# Altium PCB PCB.PcbDoc (part 2 of 2)
Units mil, origin at the board's own origin, x right, y up, seen from the top; angles counter-clockwise.
Board outline 1965.12 x 2985.07 mil, 4 copper layers (Top Layer, digital, gnd, Bottom Layer), stack 23.756 mil thick; 141 components, 79 nets, 449 pads, 482 vias.
Unrouted connection lines stored in the file: 63.
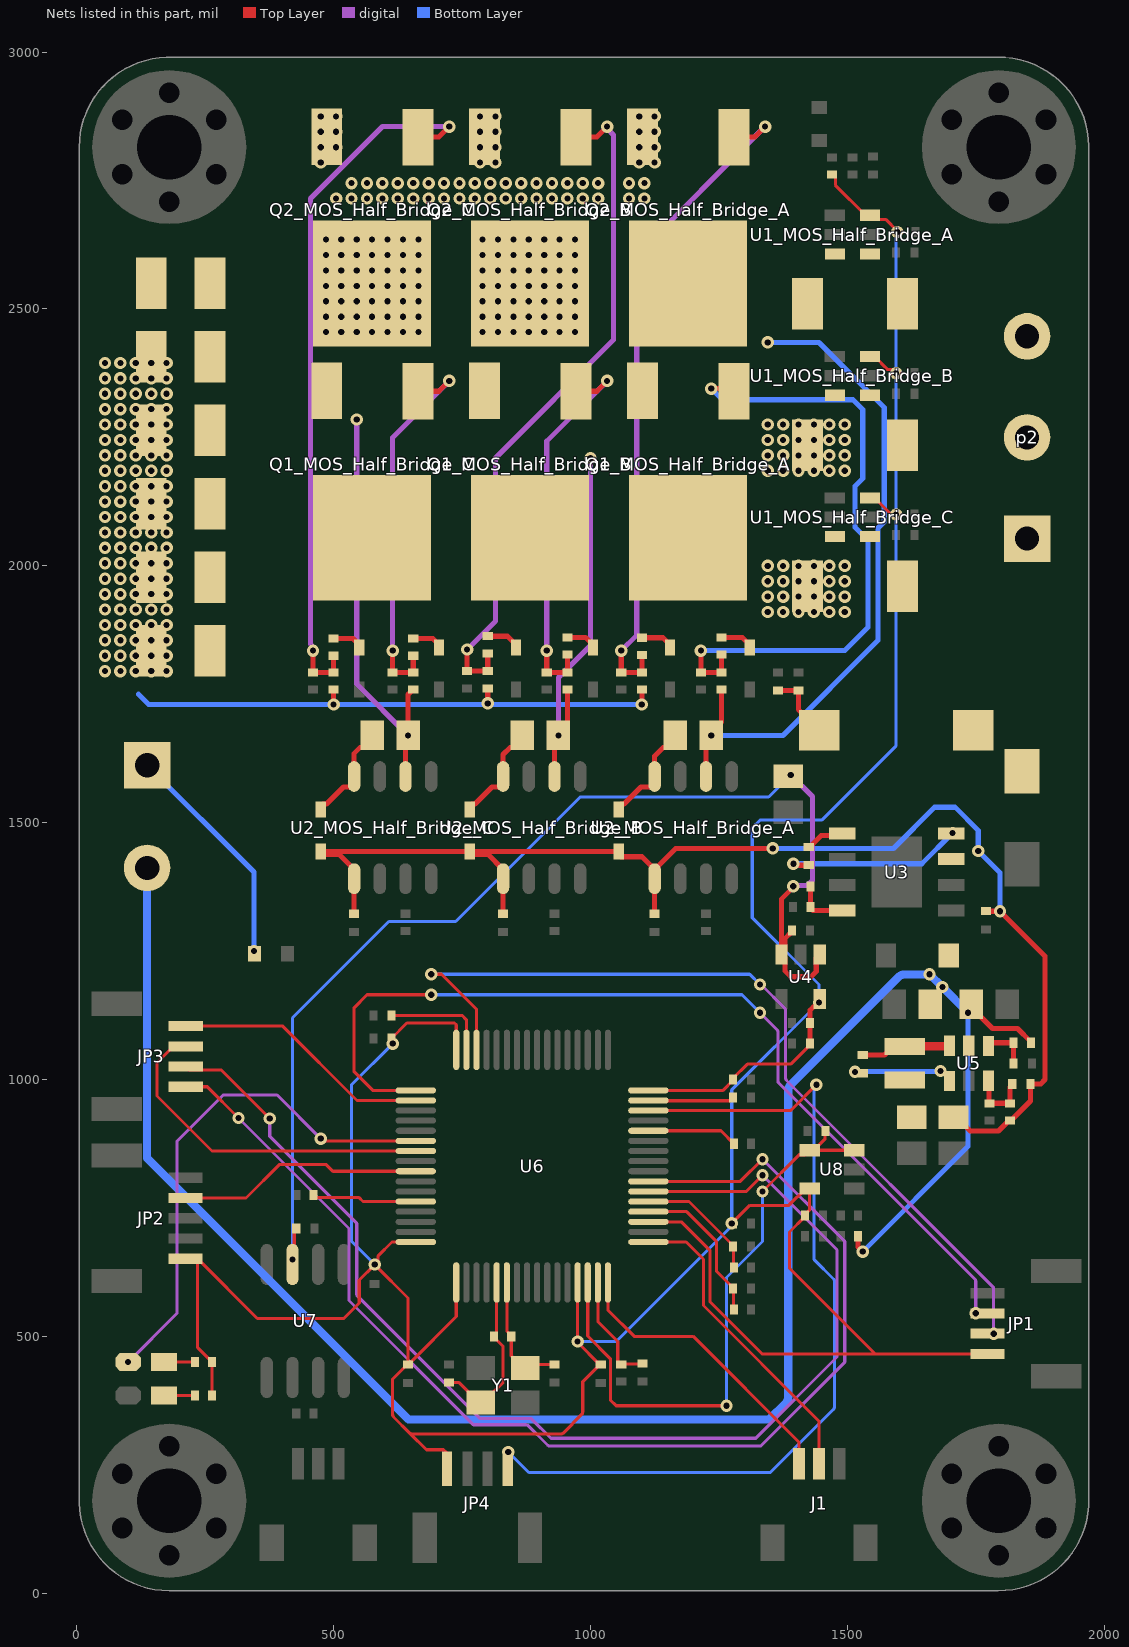
[diagram p4: the nets of this part, all layers, seen from the top]

## Via types
v1: diameter 24, hole 12, Top Layer to Bottom Layer, tented both sides, 482 vias

## Nets (pads, with @x,y where several pads share a name; then routed paths per layer and width w, separated by ;. In a path a pad name is that pad's centre, name@x,y a point inside that pad or via, vN(x,y) a via of type N, cw(c..) or ccw(c..) an arc to the next point about the centre after c; other vN are vias at no path point) (continued)
INC_SDA: JP4.4 U6.30 | length 1730.9
  Top Layer w6: JP4.4@839.05,242.12 839.05,274.05 v1(840,275) ; U6.30@1112.79,939.64 1387.15,939.64 ccw(c1387.15,945.64) 1391.38,941.38 v1(1439.85,989.85)
  Bottom Layer w6: v1(840,275) 880,235 1350,235 1473.24,358.24 ccw(c1469,362.49) 1475,362.49 1475,607.51 ccw(c1469,607.51) 1473.26,611.74 1436.75,648.25 cw(c1441,652.49) 1435,652.49 1435,977.94 cw(c1441,977.94) 1435.54,980.43 v1(1439.85,989.85)
ISA: C36.2 R24.1 U6.15 | length 221.5
  Top Layer w6: U6.15@1014.37,605 1014.37,528.93 1053.15,490.14 1053.15,450.22 1058.03,445.34 R24.1@1060,445.34 1060.98,446.32 1100.02,446.32 C36.2@1101,447.31
ISB: C38.2 R27.1 U6.20 | length 303.4
  Top Layer w6: U6.20@1112.79,742.79 1187.21,742.79 1245,685 1245,627.35 1277.38,594.97 C38.2@1277.38,593 1278.37,592.02 1278.37,552.98 R27.1@1279.35,552
ISC: C39.2 R28.1 U6.21 | length 243.8
  Top Layer w6: U6.21@1112.79,762.47 1191.89,762.47 1277.38,676.97 C39.2@1277.38,675 1278.37,674.02 1278.37,634.98 R28.1@1279.35,634
LED: LED2.2 U6.54 | length 1008.7
  Top Layer w6: v1(475,885) 479.42,880.58 U6.54@660.05,880.58
  digital w6: v1(100,450) 195,545 195,880 285,970 390,970 v1(475,885)
NetC5_MOS_Half_Bridge_A_1: C5_MOS_Half_Bridge_A.1 D3_MOS_Half_Bridge_A.2 U2_MOS_Half_Bridge_A.8 | length 208.2
  Top Layer w10: D3_MOS_Half_Bridge_A.2@1055,1525.94 1055,1531.45 1059.84,1536.29 1065.35,1536.29 1098.38,1569.32 1118.53,1569.32 1125,1575.79 U2_MOS_Half_Bridge_A.8@1125,1590 1125,1630.04 1141.02,1646.06 1147.13,1646.06 1164.96,1663.9 C5_MOS_Half_Bridge_A.1@1164.96,1670
NetC5_MOS_Half_Bridge_B_1: C5_MOS_Half_Bridge_B.1 D3_MOS_Half_Bridge_B.2 U2_MOS_Half_Bridge_B.8 | length 202.2
  Top Layer w10: D3_MOS_Half_Bridge_B.2@765,1525.94 765,1531.45 769.84,1536.29 775.35,1536.29 808.38,1569.32 823.53,1569.32 830,1575.79 U2_MOS_Half_Bridge_B.8@830,1590 830,1632.52 843.54,1646.06 849.65,1646.06 867.48,1663.9 C5_MOS_Half_Bridge_B.1@867.48,1670
NetC5_MOS_Half_Bridge_C_1: C5_MOS_Half_Bridge_C.1 D3_MOS_Half_Bridge_C.2 U2_MOS_Half_Bridge_C.8 | length 201.2
  Top Layer w10: D3_MOS_Half_Bridge_C.2@475,1525.94 475,1531.45 479.84,1536.29 486.29,1536.29 519.32,1569.32 533.53,1569.32 540,1575.79 U2_MOS_Half_Bridge_C.8@540,1590 540,1635 551.06,1646.06 557.17,1646.06 575,1663.9 C5_MOS_Half_Bridge_C.1@575,1670
NetC7_1: C7.1 D4.2 L1.1 U3.8 | length 366
  Top Layer w10: v1(1395,1420) 1397.72,1417.28 C7.1@1425,1417.28
  Bottom Layer w10: v1(1395,1420) 1645,1420 v1(1705,1480)
NetC7_2: C7.2 U3.1 | length 75.8
  Top Layer w10: C7.2@1425,1452.71 1426.97,1452.71 1449.26,1475 1485.94,1475 U3.1@1489.95,1479.01
NetC15_1: C15.1 L2.1 U5.6 | length 176.6
  Top Layer w10: C15.1@1530,1047.72 1572.55,1047.72 1588.88,1064.04 L2.1@1611.52,1064.04
  Top Layer w16: L2.1@1611.52,1064.04 1612.44,1064.97 1698.19,1064.97 U5.6@1699.12,1065.89
NetC15_2: C15.2 U5.1 | length 198
  Top Layer w10: v1(1681.52,1016.56) 1685.31,1016.56 1689.94,1011.93 1693.29,1011.93 1699.12,1006.1 U5.1@1699.12,997.24
  Bottom Layer w10: v1(1515,1015) 1515.78,1015.78 1680.73,1015.78 v1(1681.52,1016.56)
NetC16_1: C16.1 R15.1 R16.2 U5.3 | length 124.3
  Top Layer w10: U5.3@1774.52,997.56 1775.56,996.52 1775.56,954.79 R16.2@1776.6,953.75 R15.1@1816.52,953.75 1816.52,985.03 1821.09,989.6 C16.1@1821.09,991.57
NetC19_2: C19.2 R14.2 U5.4 | length 91.9
  Top Layer w10: U5.4@1774.52,1065.56 1774.52,1065.74 1780.34,1071.57 R14.2@1823.8,1071.57 C19.2@1823.8,1031.57
NetC28_2: C28.2 U6.31 | length 168.3
  Top Layer w6: U6.31@1112.79,959.32 1113.45,958.66 1272.41,958.66 1277.29,963.53 C28.2@1277.29,965
NetC29_2: C29.2 U6.47 | length 208.1
  Top Layer w6: C29.2@612.71,1125 750,1125 758.47,1116.53 U6.47@758.47,1057.74
NetD1_MOS_Half_Bridge_A_1: D1_MOS_Half_Bridge_A.1 R1_MOS_Half_Bridge_A.1 | length 66.4
  Top Layer w10: R1_MOS_Half_Bridge_A.1@1255,1860.75 1295.7,1860.75 1310,1846.45 D1_MOS_Half_Bridge_A.1@1310,1840.94
NetD1_MOS_Half_Bridge_B_1: D1_MOS_Half_Bridge_B.1 R1_MOS_Half_Bridge_B.1 | length 61.4
  Top Layer w10: R1_MOS_Half_Bridge_B.1@955,1860.75 990.7,1860.75 1005,1846.45 D1_MOS_Half_Bridge_B.1@1005,1840.94
NetD1_MOS_Half_Bridge_C_1: D1_MOS_Half_Bridge_C.1 R1_MOS_Half_Bridge_C.1 | length 60.5
  Top Layer w10: R1_MOS_Half_Bridge_C.1@655,1858.46 692.99,1858.46 705,1846.45 D1_MOS_Half_Bridge_C.1@705,1840.94
NetD2_MOS_Half_Bridge_A_1: D2_MOS_Half_Bridge_A.1 R5_MOS_Half_Bridge_A.1 | length 66.1
  Top Layer w10: R5_MOS_Half_Bridge_A.1@1100,1860 1141.45,1860 1155,1846.45 D2_MOS_Half_Bridge_A.1@1155,1840.94
NetD2_MOS_Half_Bridge_B_1: D2_MOS_Half_Bridge_B.1 R5_MOS_Half_Bridge_B.1 | length 67.4
  Top Layer w10: R5_MOS_Half_Bridge_B.1@799.99,1863.04 838.41,1863.04 855,1846.45 D2_MOS_Half_Bridge_B.1@855,1840.94
NetD2_MOS_Half_Bridge_C_1: D2_MOS_Half_Bridge_C.1 R5_MOS_Half_Bridge_C.1 | length 60.5
  Top Layer w10: R5_MOS_Half_Bridge_C.1@500,1858.46 537.99,1858.46 550,1846.45 D2_MOS_Half_Bridge_C.1@550,1840.94
NetLED1_1: LED1.1 R12.2 | length 60.1
  Top Layer w6: LED1.1@170,384.74 229.74,384.74 R12.2@230,385
NetLED2_1: LED2.1 R18.2 | length 60
  Top Layer w6: LED2.1@170,450 R18.2@230,450
NetQ1_MOS_Half_Bridge_A_1: Q1_MOS_Half_Bridge_A.1 R1_MOS_Half_Bridge_A.2 R2_MOS_Half_Bridge_A.2 R3_MOS_Half_Bridge_A.2 | length 1259.8
  Top Layer w10: v1(1215,1835) R2_MOS_Half_Bridge_A.2@1215,1792.71 R3_MOS_Half_Bridge_A.2@1255,1792.71 R1_MOS_Half_Bridge_A.2@1255,1827.29 ; v1(1235,2345) 1274.32,2345 Q1_MOS_Half_Bridge_A.1@1279.55,2339.77
  Bottom Layer w10: v1(1215,1835) 1495,1835 1540,1880 1540,2050 1515,2075 1515,2155 1530,2170 1530,2304.14 1510.91,2323.23 1256.77,2323.23 v1(1235,2345)
NetQ1_MOS_Half_Bridge_B_1: Q1_MOS_Half_Bridge_B.1 R1_MOS_Half_Bridge_B.2 R2_MOS_Half_Bridge_B.2 R3_MOS_Half_Bridge_B.2 | length 759.4
  Top Layer w10: v1(915,1835) R2_MOS_Half_Bridge_B.2@915,1792.71 R3_MOS_Half_Bridge_B.2@955,1792.71 R1_MOS_Half_Bridge_B.2@955,1827.29 ; Q1_MOS_Half_Bridge_B.1@972.05,2339.77 1012.27,2339.77 v1(1032.5,2360)
  digital w10: v1(915,1835) 915,2242.5 v1(1032.5,2360)
NetQ1_MOS_Half_Bridge_C_1: Q1_MOS_Half_Bridge_C.1 R1_MOS_Half_Bridge_C.2 R2_MOS_Half_Bridge_C.2 R3_MOS_Half_Bridge_C.2 | length 754
  Top Layer w10: v1(615,1835) R2_MOS_Half_Bridge_C.2@615,1792.71 R3_MOS_Half_Bridge_C.2@655,1792.71 R1_MOS_Half_Bridge_C.2@655,1825 ; Q1_MOS_Half_Bridge_C.1@664.55,2339.77 704.77,2339.77 v1(725,2360)
  digital w10: v1(615,1835) 615,2250 v1(725,2360)
NetQ2_MOS_Half_Bridge_A_1: Q2_MOS_Half_Bridge_A.1 R5_MOS_Half_Bridge_A.2 R6_MOS_Half_Bridge_A.2 R7_MOS_Half_Bridge_A.2 | length 1320.9
  Top Layer w10: v1(1060,1835) R6_MOS_Half_Bridge_A.2@1060,1792.71 R7_MOS_Half_Bridge_A.2@1100,1792.71 R5_MOS_Half_Bridge_A.2@1100,1826.54 ; Q2_MOS_Half_Bridge_A.1@1279.55,2834.77 1319.77,2834.77 v1(1340,2855)
  digital w10: v1(1060,1835) 1090,1865 1090,2605 v1(1340,2855)
NetQ2_MOS_Half_Bridge_B_1: Q2_MOS_Half_Bridge_B.1 R5_MOS_Half_Bridge_B.2 R6_MOS_Half_Bridge_B.2 R7_MOS_Half_Bridge_B.2 | length 1326.6
  Top Layer w10: v1(760,1837.29) R6_MOS_Half_Bridge_B.2@760,1795 R7_MOS_Half_Bridge_B.2@800,1795 R5_MOS_Half_Bridge_B.2@799.99,1829.57 ; Q2_MOS_Half_Bridge_B.1@972.05,2834.77 1012.27,2834.77 v1(1032.5,2855)
  digital w10: v1(760,1837.29) 815,1892.29 815,2210 1045,2440 1045,2838.71 1032.5,2851.21 v1(1032.5,2855)
NetQ2_MOS_Half_Bridge_C_1: Q2_MOS_Half_Bridge_C.1 R5_MOS_Half_Bridge_C.2 R6_MOS_Half_Bridge_C.2 R7_MOS_Half_Bridge_C.2 | length 1393.5
  Top Layer w10: v1(460,1835) R6_MOS_Half_Bridge_C.2@460,1792.71 R7_MOS_Half_Bridge_C.2@500,1792.71 R5_MOS_Half_Bridge_C.2@500,1825 ; Q2_MOS_Half_Bridge_C.1@664.55,2834.77 704.77,2834.77 v1(725,2855)
  digital w10: v1(460,1835) 457.32,1837.68 457.32,1845.54 455,1847.86 455,2715 595,2855 v1(725,2855)
NetR9_2: R9.2 R10.1 U3.4 | length 105.9
  Top Layer w10: R9.2@1428.13,1376.15 R10.1@1428.13,1336.15 1428.13,1334.18 1433.3,1329.01 U3.4@1489.95,1329.01
NetR17_1: R17.1 U6.28 | length 176.9
  Top Layer w6: U6.28@1112.79,900.27 1253.98,900.27 R17.1@1279.25,875
NetR19_1: R19.1 U6.60 | length 204.6
  Top Layer w6: R19.1@460.75,775 460.75,774.87 465.63,770 549.79,770 557.32,762.47 U6.60@660.05,762.47
OSC1: C30.2 R21.2 U6.5 Y1.1 | length 340.8
  Top Layer w6: C30.2@725,409.88 744.41,409.88 782.76,371.54 Y1.1@786.69,371.54 790.63,371.54 830,410.91 830,480.32 812.29,498.03 R21.2@812.29,500 812.29,501.97 817.52,507.21 U6.5@817.52,605
OSC2: C31.1 R21.1 U6.6 Y1.3 | length 243.3
  Top Layer w6: U6.6@837.21,605 837.21,510.51 845.75,501.97 R21.1@845.75,500 845.75,462.08 869.37,438.46 Y1.3@873.31,438.46 880.15,445.31 C31.1@930,445.31
OUT_MOS_Half_Bridge_A: p2.3 R4_MOS_Half_Bridge_A.1 U1_MOS_Half_Bridge_A.4
OUT_MOS_Half_Bridge_B: p2.2 R4_MOS_Half_Bridge_B.1 U1_MOS_Half_Bridge_B.4
OUT_MOS_Half_Bridge_C: p2.1 R4_MOS_Half_Bridge_C.1 U1_MOS_Half_Bridge_C.4
PGND: C3_MOS_Half_Bridge_A.1 C3_MOS_Half_Bridge_B.1 C3_MOS_Half_Bridge_C.1 C4_MOS_Half_Bridge_A.1 C4_MOS_Half_Bridge_B.1 C4_MOS_Half_Bridge_C.1 p1.1 Q2_MOS_Half_Bridge_A.3 Q2_MOS_Half_Bridge_B.3 Q2_MOS_Half_Bridge_C.3 R7_MOS_Half_Bridge_A.1 R7_MOS_Half_Bridge_B.1 R7_MOS_Half_Bridge_C.1 R13.1 | length 1524.2
  Top Layer w10: v1(500,1730) R7_MOS_Half_Bridge_C.1@500,1759.25 ; v1(800,1732.29) R7_MOS_Half_Bridge_B.1@800,1761.54 ; v1(1100,1730) R7_MOS_Half_Bridge_A.1@1100,1759.25
  Bottom Layer w10: 120,1750 140,1730 v1(500,1730) v1(1100,1730) ; p1.1@137,1612 345,1404 v1(345,1250)
  other v1: 55,1795 85,1795 115,1795 145,1795 175,1795 55,1825 85,1825 115,1825 145,1825 175,1825 55,1855 85,1855 115,1855 145,1855 175,1855 55,1885 85,1885 115,1885 145,1885 175,1885 55,1915 85,1915 115,1915 145,1915 175,1915 55,1945 85,1945 115,1945 145,1945 175,1945 55,1975 85,1975 115,1975 145,1975 175,1975 55,2005 85,2005 115,2005 145,2005 175,2005 55,2035 85,2035 115,2035 145,2035 175,2035 55,2065 85,2065 115,2065 145,2065 175,2065 55,2095 85,2095 115,2095 145,2095 175,2095 55,2125 85,2125 115,2125 145,2125 175,2125 55,2155 85,2155 115,2155 145,2155 175,2155 55,2185 85,2185 115,2185 145,2185 175,2185 55,2215 85,2215 115,2215 145,2215 175,2215 55,2245 85,2245 115,2245 145,2245 175,2245 55,2275 85,2275 115,2275 145,2275 175,2275 55,2305 85,2305 115,2305 145,2305 175,2305 55,2335 85,2335 115,2335 145,2335 175,2335 55,2365 85,2365 115,2365 145,2365 175,2365 55,2395 85,2395 115,2395 145,2395 175,2395 505,2715 535,2715 565,2715 595,2715 625,2715 655,2715 685,2715 715,2715 745,2715 775,2715 805,2715 835,2715 865,2715 895,2715 925,2715 955,2715 985,2715 1015,2715 1075,2715 1105,2715 535,2745 565,2745 595,2745 625,2745 655,2745 685,2745 715,2745 745,2745 775,2745 805,2745 835,2745 865,2745 895,2745 925,2745 955,2745 985,2745 1015,2745 1075,2745 1105,2745 475,2785 785,2785 815,2785 1095,2785 1125,2785 475,2815 505,2815 785,2815 815,2815 1095,2815 1125,2815 475,2845 505,2845 785,2845 815,2845 1095,2845 1125,2845 475,2875 505,2875 785,2875 815,2875 1095,2875 1125,2875
SH_MOS_Half_Bridge_A: C5_MOS_Half_Bridge_A.2 Q1_MOS_Half_Bridge_A.3 Q2_MOS_Half_Bridge_A.2 R3_MOS_Half_Bridge_A.1 R4_MOS_Half_Bridge_A.2 U1_MOS_Half_Bridge_A.3 U2_MOS_Half_Bridge_A.6 | length 1323.7
  Top Layer w10: U2_MOS_Half_Bridge_A.6@1225,1590 1225,1659.96 v1(1235.04,1670) 1235.04,1676.1 1255,1696.06 R3_MOS_Half_Bridge_A.1@1255,1759.25
  digital w10: v1(1235.04,1670) v1@1235.04,1672.9
  Bottom Layer w10: v1(1235.04,1670) 1375,1670 1560,1855 1560,2073.47 1572,2085.47 1572,2308 1445,2435 v1(1345,2435)
SH_MOS_Half_Bridge_B: C5_MOS_Half_Bridge_B.2 Q1_MOS_Half_Bridge_B.3 Q2_MOS_Half_Bridge_B.2 R3_MOS_Half_Bridge_B.1 R4_MOS_Half_Bridge_B.2 U1_MOS_Half_Bridge_B.3 U2_MOS_Half_Bridge_B.6 | length 752.5
  Top Layer w10: U2_MOS_Half_Bridge_B.6@930,1590 930,1662.44 v1(937.56,1670) 955,1687.44 R3_MOS_Half_Bridge_B.1@955,1759.25
  digital w10: v1(937.56,1670) 937.56,1782.56 1000,1845 v1(1000,2210) v1@1005,2215
  other v1: 1345,2185 1375,2185 1405,2185 1435,2185 1465,2185 1495,2185 1345,2215 1375,2215 1405,2215 1435,2215 1465,2215 1495,2215 1345,2245 1375,2245 1405,2245 1435,2245 1465,2245 1495,2245 1345,2275 1375,2275 1405,2275 1435,2275 1465,2275 1495,2275 790,2455 820,2455 850,2455 880,2455 910,2455 940,2455 970,2455 790,2485 820,2485 850,2485 880,2485 910,2485 940,2485 970,2485 790,2515 820,2515 850,2515 880,2515 910,2515 940,2515 970,2515 790,2545 820,2545 850,2545 880,2545 910,2545 940,2545 970,2545 790,2575 820,2575 850,2575 880,2575 910,2575 940,2575 970,2575 790,2605 820,2605 850,2605 880,2605 910,2605 940,2605 970,2605 790,2635 820,2635 850,2635 880,2635 910,2635 940,2635 970,2635
SH_MOS_Half_Bridge_C: C5_MOS_Half_Bridge_C.2 Q1_MOS_Half_Bridge_C.3 Q2_MOS_Half_Bridge_C.2 R3_MOS_Half_Bridge_C.1 R4_MOS_Half_Bridge_C.2 U1_MOS_Half_Bridge_C.3 U2_MOS_Half_Bridge_C.6 | length 833.1
  Top Layer w10: U2_MOS_Half_Bridge_C.6@640,1590 640,1664.92 v1(645.08,1670) 645.08,1749.32 650.16,1754.41 650.16,1756.37 653.03,1759.25 R3_MOS_Half_Bridge_C.1@655,1759.25
  digital w10: v1(545,2285) 545,1770.08 v1(645.08,1670)
  other v1: 1345,1910 1375,1910 1405,1910 1435,1910 1465,1910 1495,1910 1345,1940 1375,1940 1405,1940 1435,1940 1465,1940 1495,1940 1345,1970 1375,1970 1405,1970 1435,1970 1465,1970 1495,1970 1345,2000 1375,2000 1405,2000 1435,2000 1465,2000 1495,2000 485,2455 515,2455 545,2455 575,2455 605,2455 635,2455 665,2455 485,2485 515,2485 545,2485 575,2485 605,2485 635,2485 665,2485 485,2515 515,2515 545,2515 575,2515 605,2515 635,2515 665,2515 485,2545 515,2545 545,2545 575,2545 605,2545 635,2545 665,2545 485,2575 515,2575 545,2575 575,2575 605,2575 635,2575 665,2575 485,2605 515,2605 545,2605 575,2605 605,2605 635,2605 665,2605 485,2635 515,2635 545,2635 575,2635 605,2635 635,2635 665,2635
SPI1_CS: JP3.1 U6.50 | length 507.9
  Top Layer w6: JP3.1@212.12,1104.05 400.95,1104.05 545.68,959.32 U6.50@660.05,959.32
SPI1_MISO: JP3.3 U6.22 | length 2384
  Top Layer w6: JP3.3@212.12,1025.32 218.97,1018.47 281.53,1018.47 v1(375.68,924.32) ; U6.22@1112.79,782.16 1303.58,782.16 v1(1335,813.58)
  digital w6: v1(375.68,924.32) 375.68,889.32 545,720 545,582.49 ccw(c551,582.49) 546.74,578.26 783.27,341.73 ccw(c787.49,346) 787.45,340 885,340 923.24,301.76 1321.76,301.76 1480,460 1480,668.58 v1(1335,813.58)
SPI1_MOSI: JP3.4 U6.23 | length 2423
  Top Layer w6: JP3.4@212.12,985.95 254.05,985.95 v1(315,925) ; U6.23@1112.79,801.84 1291.84,801.84 v1(1335,845)
  digital w6: v1(315,925) 530,710 530,570 770.02,329.98 772,328 874.51,328 cw(c874.51,322) 878.73,326.27 916.51,288.49 ccw(c920.73,292.76) 920.69,286.76 1331.76,286.76 1495,450 1495,685 v1(1335,845)
SPI1_SCK: JP3.2 U6.55 | length 681.9
  Top Layer w6: JP3.2@212.12,1064.68 188.5,1064.68 156.22,1032.4 156.22,967.99 263.31,860.9 U6.55@660.05,860.9
SWCLK: JP1.3 U6.49 | length 1833
  Top Layer w6: U6.49@660.05,979.01 575.99,979.01 540,1015 540,1140 565,1165 v1(690,1165)
  digital w6: v1(1330,1130) 1363.24,1096.76 cw(c1359,1092.51) 1365,1092.51 1365,997.49 ccw(c1371,997.49) 1366.74,993.26 1748.26,611.74 cw(c1744,607.51) 1750,607.51 v1(1750,545)
  Bottom Layer w6: v1(690,1165) 1295,1165 v1(1330,1130)
SWDIO: JP1.2 U6.46 | length 1712.4
  Top Layer w6: v1(690,1205) 710,1205 778.15,1136.85 U6.46@778.15,1057.74
  digital w6: v1(1330,1185) 1331.97,1185 1378.24,1138.73 cw(c1374,1134.49) 1380,1134.49 1380,1002.49 ccw(c1386,1002.49) 1381.74,998.26 1783.26,596.74 cw(c1779,592.51) 1785,592.51 v1(1785,505.18)
  Bottom Layer w6: v1(690,1205) 1310,1205 v1(1330,1185)
U2_RX: J1.2 U6.17 | length 612.6
  Top Layer w6: U6.17@1112.79,683.73 1186.27,683.73 1220,650 1220,560 1445,335 J1.2@1445,251.77
U2_TX: J1.1 U6.16 | length 574.5
  Top Layer w6: U6.16@1034.06,605 1034.06,550.94 1085,500 1200,500 1405.63,294.37 J1.1@1405.63,251.77
VBS: C34.1 U6.14 U8.3 U8.4 | length 1182.8
  Top Layer w6: U6.14@994.69,605 994.69,500.75 1038.84,456.6 1038.84,376.16 1050,365 v1(1265,365) ; v1(1335,782.16) 1406.43,853.59 1417.88,853.59 U8.4@1426.69,862.4 U8.4@1434.57,862.4 ; C34.1@1457.72,900 1456.84,899.12 1456.84,884.67 U8.4@1434.57,862.4 ; U8.3@1513.31,862.4 U8.4@1434.57,862.4
  Bottom Layer w6: v1(1265,365) 1265,614.7 1335,684.7 v1(1335,782.16)
VCC3V3: C1_MOS_Half_Bridge_A.2 C1_MOS_Half_Bridge_B.2 C1_MOS_Half_Bridge_C.2 C13.2 C14.2 C22.1 C23.1 C24.1 C25.1 C26.1 C27.1 C33.2 JP1.1 JP2.5 JP4.1 R12.1 R18.1 R25.1 U1_MOS_Half_Bridge_A.6 U1_MOS_Half_Bridge_B.6 U1_MOS_Half_Bridge_C.6 U4.5 U6.1 U6.13 U6.19 U6.32 U6.48 U6.64 U8.5 | length 7605.9
  Top Layer w6: JP2.5@211.74,651.26 JP2.5@235.36,651.26 ; R12.1@263.46,385 R18.1@263.46,450 235.36,478.11 JP2.5@235.36,651.26 ; C22.1@578.03,637.72 550,609.69 550,565 520,535 351.62,535 JP2.5@235.36,651.26 ; C22.1@580,637.72 581.97,637.72 645,574.69 C26.1@645,445 ; C22.1@586.84,642.59 586.84,656.84 613.73,683.73 U6.64@660.05,683.73 ; C23.1@612.72,1080 642.72,1110 735.27,1110 738.78,1106.49 U6.48@738.78,1057.74 ; JP4.1@720.95,248.82 720.95,272.44 714.1,279.28 680.72,279.28 648.26,311.74 ; U6.1@738.78,605 738.78,538.78 651.84,451.84 651.84,449.87 646.97,445 C26.1@645,445 ; U6.13@975,605 v1(975,490) 975,488.03 C25.1@1018.03,445 ; C25.1@1020,445 C25.1@1018.03,445 ; U6.19@1112.79,723.1 1176.9,723.1 1233,667 1233,567 1334.05,465.95 1554.05,465.95 ; U6.32@1112.79,979.01 1258.26,979.01 1277.28,998.03 C24.1@1277.28,1000 1277.28,1001.97 1305.31,1030 1389.68,1030 1427.71,1068.03 C14.2@1427.71,1070 ; v1(1275,720) C27.1@1277.28,720 1277.28,721.97 1310.31,755 1386.22,755 1418.82,787.6 U8.5@1426.69,787.6 1426.69,746.38 1417.29,736.97 C33.2@1417.29,735 1417.29,733.03 1387.49,703.23 1387.49,632.51 1554.05,465.95 ; R25.1@1470,2761.54 1471.97,2761.54 1476.84,2756.66 1476.84,2741.02 1535.46,2682.4 U1_MOS_Half_Bridge_A.6@1544.32,2682.4 1552.15,2674.57 1574.68,2674.57 1597.29,2651.97 v1(1597.29,2650) ; U1_MOS_Half_Bridge_B.6@1544.32,2407.4 1553.18,2407.4 1578.73,2381.85 C1_MOS_Half_Bridge_B.2@1590.13,2381.85 ; U1_MOS_Half_Bridge_C.6@1560.58,2125 1582.14,2103.44 ; JP1.1@1772.88,465.95 1554.05,465.95 ; C26.1@645,445 643.03,445 615,416.97 615,347.49 ccw(c621,347.49) 616.74,343.26 648.26,311.74 ; 648.26,311.74 ccw(c652.49,316) 652.49,310 942.51,310 ccw(c942.51,316) 946.76,311.76 983.27,348.27 ccw(c979,352.49) 985,352.49 985,411.97 C25.1@1018.03,445
  Top Layer w10: C14.2@1427.71,1070 C13.2@1427.71,1110 1427.71,1134.84 U4.5@1434.84,1141.97
  Bottom Layer w6: v1(580,640) 535,685 535,990 v1(615,1070) ; v1(975,490) 1050,490 1268.65,708.65 ; v1(1275,720) 1275,980 v1(1445,1150) 1445,1185 1315,1315 1315,1490 1330,1505 1450,1505 1595,1650 v1(1595,2100) v1(1595,2375.01) 1595,2647.72 v1(1597.29,2650)
VCC5: C8.2 C9.2 C11.2 C12.2 C32.2 L1.2 R9.1 U4.1 U4.3 U7.3 | length 2445.6
  Top Layer w6: U7.3@420,640 423.44,643.44 423.44,706.16 C32.2@427.29,710
  Top Layer w10: C9.2@1365,1757.29 C8.2@1405,1757.29 1405,1720 L1.2@1445,1680 ; C12.2@1392.29,1290 1392.29,1288.03 1378.41,1274.16 1378.41,1250.09 U4.3@1371.6,1243.28 ; v1(1394.67,1376.15) 1394.67,1374.18 1371.6,1351.12 U4.3@1371.6,1243.28 ; U4.1@1446.4,1243.27 1439.59,1236.46 1439.59,1210.45 1429.14,1200 1390,1200 1378.41,1211.59 1378.41,1236.46 U4.3@1371.6,1243.28
  digital w10: v1(1390,1593) 1432,1551 1432,1388 1421.67,1377.67 1396.18,1377.67 v1(1394.67,1376.15)
  Bottom Layer w6: v1(420,650) 420,1120 607.5,1307.5 737.5,1307.5 980,1550 1347,1550 v1(1390,1593)
VCC12: C6_MOS_Half_Bridge_A.2 C6_MOS_Half_Bridge_B.2 C6_MOS_Half_Bridge_C.2 C10.2 C16.2 C20.2 C21.2 D3_MOS_Half_Bridge_A.1 D3_MOS_Half_Bridge_B.1 D3_MOS_Half_Bridge_C.1 L2.2 R15.2 U2_MOS_Half_Bridge_A.1 U2_MOS_Half_Bridge_B.1 U2_MOS_Half_Bridge_C.1 U3.7 | length 2601.7
  Top Layer w10: C6_MOS_Half_Bridge_C.2@540,1322.71 U2_MOS_Half_Bridge_C.1@540,1391 540,1409 510.45,1438.55 479.84,1438.55 475,1443.39 D3_MOS_Half_Bridge_C.1@475,1444.06 D3_MOS_Half_Bridge_B.1@765,1444.06 ; C6_MOS_Half_Bridge_B.2@830,1322.71 U2_MOS_Half_Bridge_B.1@830,1391 830,1409 800.45,1438.55 769.84,1438.55 765,1443.39 D3_MOS_Half_Bridge_B.1@765,1444.06 ; C6_MOS_Half_Bridge_A.2@1125,1322.71 U2_MOS_Half_Bridge_A.1@1125,1391 U2_MOS_Half_Bridge_A.1@1125,1409 ; v1(1355,1450) 1166,1450 U2_MOS_Half_Bridge_A.1@1125,1409 ; C20.2@1706.52,926.6 1712.62,926.6 1739.22,900 1794.26,900 1814.55,920.29 R15.2@1816.52,920.29 1818.49,920.29 1856.52,958.32 C16.2@1856.52,991.56 1876.56,991.56 1885,1000 1885,1240 v1(1797.29,1327.71) C10.2@1770,1327.71 ; D3_MOS_Half_Bridge_B.1@765,1444.06 D3_MOS_Half_Bridge_A.1@1055,1444.06 1055,1438.55 1059.84,1433.71 1100.29,1433.71 U2_MOS_Half_Bridge_A.1@1125,1409
  Bottom Layer w10: v1(1355,1450) 1590,1450 1670,1530 1710,1530 1755,1485 v1(1755,1445) 1797.29,1402.71 v1(1797.29,1327.71)
VDRAIN: C3_MOS_Half_Bridge_A.2 C3_MOS_Half_Bridge_B.2 C3_MOS_Half_Bridge_C.2 C4_MOS_Half_Bridge_A.2 C4_MOS_Half_Bridge_B.2 C4_MOS_Half_Bridge_C.2 C17.2 C18.2 D5.1 p1.2 Q1_MOS_Half_Bridge_A.2 Q1_MOS_Half_Bridge_B.2 Q1_MOS_Half_Bridge_C.2 R14.1 R22.2 U5.5 | length 3845.7
  Top Layer w10: R22.2@1520.75,695 1520.75,674.25 v1(1530,665) ; C18.2@1743.47,1138.47 1782.42,1099.52 1831.29,1099.52 1857.27,1073.54 R14.1@1857.27,1071.57
  Bottom Layer w10: v1(1530,665) 1735,870 v1(1735,1130)
  Bottom Layer w16: p1.2@137,1412 137,847 646,338 1348,338 1380.31,370.31 ccw(c1369,381.63) 1385,381.63 1385,978.43 cw(c1401,978.37) 1389.64,989.64 1599.88,1199.88 cw(c1611.17,1188.54) 1611.17,1204.54 1659.54,1204.54 v1(1660,1205) v1(1685,1180) v1(1735,1130)
Z: JP2.2 U6.57 | length 481.1
  Top Layer w6: JP2.2@211.74,769.37 329.37,769.37 395,835 485,835 498.47,821.53 U6.57@660.05,821.53
pads on no net: 1.1 2.1 3.1 4.1 J1.0 J2.0 JP1.5 JP1.6 JP2.6 JP2.7 JP3.5 JP3.6 JP4.5 JP4.6 U3.2 U3.3 U3.5 U3.9 U4.4 U6.2 U6.3 U6.4 U6.7 U6.8 U6.9 U6.10 U6.11 U6.24 U6.25 U6.26 U6.27 U6.33 U6.34 U6.35 U6.36 U6.37 U6.38 U6.39 U6.40 U6.44 U6.45 U6.51 U6.52 U6.53 U6.56 U7.5

## Polygon pours and split planes (outlines as drawn)
GND on Top Layer "GND_L01_P044" (solid, remove dead copper, pour order 44): -110,3190 -115,3185 -115,-90 2075,-90 2160,-175 2160,3250
VDRAIN on Top Layer "Top Layer-VDRAIN" (solid, pour order 43): 1750,1095 1770,1115 1770,1180 1735,1215 1735,1260 1725,1270 1665,1270 1635,1240 1635,1120 1645,1110 1705,1110 1725,1090 1725,1045 1750,1045
VCC12 on Top Layer "VCC12_L01_P031" (solid, pour order 31): 1570,1015 1650,1015 1650,965 1665,950 1735,950 1735,900 1595,900 1570,925
VCC5 on Top Layer "VCC5_L01_P028" (solid, pour order 28): 1405,1720 1485,1720 1490,1715 1490,1645 1485,1640 1440,1640 1415,1615 1415,1565 1355,1565 1355,1670
VCC12 on Top Layer "VCC12_L01_P027" (solid, pour order 27): 1885,1555 1885,1445 1855,1415 1675,1415 1675,1440 1730,1440 1755,1465 1755,1545 1800,1590
GND on Top Layer "GND_L01_P026" (solid, pour order 26): 1675,1395 1675,1365 1735,1365 1870,1365 1885,1380 1885,1460 1875,1470 1810,1470 1735,1395 1715,1395
NetC7_1 on Top Layer "NETC7_1_L01_P025" (solid, pour order 25): 1675,1460 1675,1505 1700,1530 1700,1725 1705,1730 1785,1730 1795,1720 1795,1665 1810,1650 1875,1650 1885,1640 1885,1555 1875,1545 1790,1545 1740,1495 1740,1460
OUT_MOS_Half_Bridge_C on Top Layer "OUT_MOS_HALF_BRIDGE_C_L01_P022" (solid, pour order 22): 1525,2070 1520,2065 1520,2025 1582.5,1962.5 1625,2005 1610,2005 1570,2045 1570,2065 1565,2070
SH_MOS_Half_Bridge_C on Top Layer "SH_MOS_HALF_BRIDGE_C_L01_P021" (solid, pour order 21): 1450,2070 1495,2070 1503.44,2061.56 1503.44,1978.44 1485,1960 1455,1990 1410,1990 1370,1990 1355,1990
OUT_MOS_Half_Bridge_B on Top Layer "OUT_MOS_HALF_BRIDGE_B_L01_P020" (solid, pour order 20): 1525,2345 1520,2340 1520,2300 1582.5,2237.5 1625,2280 1610,2280 1570,2320 1570,2340 1565,2345
SH_MOS_Half_Bridge_B on Top Layer "SH_MOS_HALF_BRIDGE_B_L01_P019" (solid, pour order 19): 1450,2345 1495,2345 1505,2335 1505,2265 1480,2240 1455,2265 1410,2265 1370,2265 1355,2265
OUT_MOS_Half_Bridge_A on Top Layer "OUT_MOS_HALF_BRIDGE_A_L01_P018" (solid, pour order 18): 1525,2620 1520,2615 1520,2575 1582.5,2512.5 1625,2555 1610,2555 1570,2595 1570,2615 1565,2620
SH_MOS_Half_Bridge_A on Top Layer "SH_MOS_HALF_BRIDGE_A_L01_P017" (solid, pour order 17): 1450,2620 1495,2620 1500,2615 1500,2575 1460,2535 1455,2540 1410,2540 1370,2540 1355,2540
OUT_MOS_Half_Bridge_C on Top Layer "OUT_MOS_HALF_BRIDGE_C_L01_P015" (solid, pour order 15): 1575,2015 1715,2015 1805,2105 1895,2105 1905,2095 1905,2005 1810,1910 1575,1910
OUT_MOS_Half_Bridge_B on Top Layer "OUT_MOS_HALF_BRIDGE_B_L01_P014" (solid, pour order 14): 1575,2295 1880,2295 1905,2270 1905,2215 1875,2185 1575,2185
OUT_MOS_Half_Bridge_A on Top Layer "OUT_MOS_HALF_BRIDGE_A_L01_P013" (solid, pour order 13): 1575,2560 1815,2560 1905,2470 1905,2410 1885,2390 1815,2390 1750,2455 1575,2455
PGND on Top Layer "PGND_L01_P011" (solid, pour order 11): 445,2885 460,2900 515,2900 535,2880 535,2790 560,2765 735,2765 760,2790 760,2890 775,2905 820,2905 840,2885 840,2790 865,2765 1040,2765 1070,2795 1070,2895 1080,2905 1135,2905 1150,2890 1150,2705 1135,2690 475,2690 445,2720
PGND on Top Layer "PGND_L01_P010" (solid, pour order 10): 45,1535 175,1535 205,1565 205,2580 185,2600 50,2600 25,2575 25,1555
VDRAIN on Top Layer "VDRAIN_L01_P009" (solid, pour order 9): 225,1785 225,1550 185,1510 45,1510 25,1490 25,1320 35,1310 290,1310 390,1410 390,1850 535,1995 535,2045 355,2045
VDRAIN on Top Layer "VDRAIN_L01_P008" (solid, pour order 8): 225,2600 225,1785 230,1780 295,1780 325,1810 325,1885 370,1930 1300,1930 1305,1935 1305,2175 1300,2180 360,2180 315,2225 315,2575 290,2600
SH_MOS_Half_Bridge_C on Top Layer "SH_MOS_HALF_BRIDGE_C_L01_P005" (solid, pour order 5): 1338.44,2013 1503.44,2013 1513.44,2003 1513.44,1908 1503.44,1898 1338.44,1898 1328.44,1908 1328.44,2003
SH_MOS_Half_Bridge_B on Top Layer "SH_MOS_HALF_BRIDGE_B_L01_P004" (solid, pour order 4): 1338.44,2288 1503.44,2288 1513.44,2278 1513.44,2183 1503.44,2173 1338.44,2173 1328.44,2183 1328.44,2278
SH_MOS_Half_Bridge_C on Top Layer "SH_MOS_HALF_BRIDGE_C_L01_P002" (solid, pour order 2): 460,2670 690,2670 690,2430 565,2430 520,2385 520,2290 510,2280 460,2280 455,2285 455,2665
SH_MOS_Half_Bridge_B on Top Layer "SH_MOS_HALF_BRIDGE_B_L01_P001" (solid, pour order 1): 765,2670 765,2285 775,2275 820,2275 830,2285 830,2395 860,2425 1000,2425 1000,2670 995,2670
SH_MOS_Half_Bridge_A on Top Layer "SH_MOS_HALF_BRIDGE_A_L01_P000" (solid, remove dead copper, pour order 0): 1060,2675 1060,2285 1075,2270 1130,2270 1145,2285 1145,2380 1190,2425 1350,2425 1380,2455 1455,2455 1465,2465 1465,2555 1455,2565 1330,2565 1305,2590 1305,2675
GND on Bottom Layer "GND_L04_P041" (solid, remove dead copper, pour order 41): -136,3069 -196,3009 -196,-327 2441,-327 2239,-125 2239,3328
SH_MOS_Half_Bridge_C on Bottom Layer "SH_MOS_HALF_BRIDGE_C_L04_P007" (solid, pour order 7): 465,2640 475,2650 670,2650 680,2640 680,2330 990,2020 1505,2020 1515,2010 1515,1905 1500,1890 805,1890 465,2230 465,2635
PGND on Bottom Layer "PGND_L04_P012" (solid, pour order 12): 1150,2890 1150,2705 1135,2690 490,2690 205,2405 205,1565 180,1540 45,1540 25,1560 25,2490 175,2640 260,2640 365,2745 365,2865 400,2900 515,2900 535,2880 535,2790 560,2765 735,2765 760,2790 760,2890 775,2905 820,2905 840,2885 840,2790 865,2765 1040,2765 1070,2795 1070,2895 1080,2905 1135,2905
SH_MOS_Half_Bridge_B on Bottom Layer "SH_MOS_HALF_BRIDGE_B_L04_P006" (solid, pour order 6): 775,2650 775,2290 900,2165 1500,2165 1515,2180 1515,2280 1500,2295 1050,2295 990,2355 990,2650 975,2665 790,2665
GND on digital "GND_L02_P039" (solid, remove dead copper, pour order 39): -222,3158 -207,3143 2248,3143 2248,-346 2125,-223 -299,-223
AGND on digital "AGND_L02_P035" (solid, pour order 35): 1495.74,2800.74 1105,2410 1105,705 1065,665 984,665 915,596 915,500 1035,380 1216.2,380 1356.2,520 1383.34,547.69 1383.34,625 1305,703.4 1305,805 1305,1465 1355,1515 1355,1860 1315,1900 1315,2000 1350,2035 1355,2030 1582.67,2030
AGND on digital "AGND_L02_P034" (solid, pour order 34): 1425,2845 1560,2845 1605,2800 1605,2725 1680,2650 1680,2085 1625,2030 1465,2030 1440,2055 1440,2125 1470,2155 1505,2155 1525,2175 1525,2275 1375,2425 1375,2795
GND on gnd "GND_L03_P040" (solid, remove dead copper, pour order 40): -228,3103 -228,-90 -136,-182 -111,-157 2071,-157 2071,3065 2155,3149

## Keep-outs
Keep-Out Layer:
  lines w10: 4.93,2815 cw(c180,2815) 175,2990 1793,2990 cw(c1795,2815) 1970,2816.99 ; 5,189.99 5,2815 ; 5.21,189.99 ccw(c180,180) 180,4.93 1794,4.93 ccw(c1795,180) 1970.05,183 1970.05,2816.99

## Text inside footprints (layer, text, board x,y; h text height)
JP3: Top Overlay "U1" at 262.69,1175.99 h45 r270
JP4: Top Overlay "U1" at 649.01,292.69 h45